# Altium PCB RheoBoard_V1.PcbDoc (part 4 of 6)
Units mm, origin at the board's own origin, x right, y up, seen from the top; angles counter-clockwise.
Board outline 146 x 88.34 mm, 2 copper layers (Top Layer, Bottom Layer); 134 components, 71 nets, 344 pads, 145 vias.
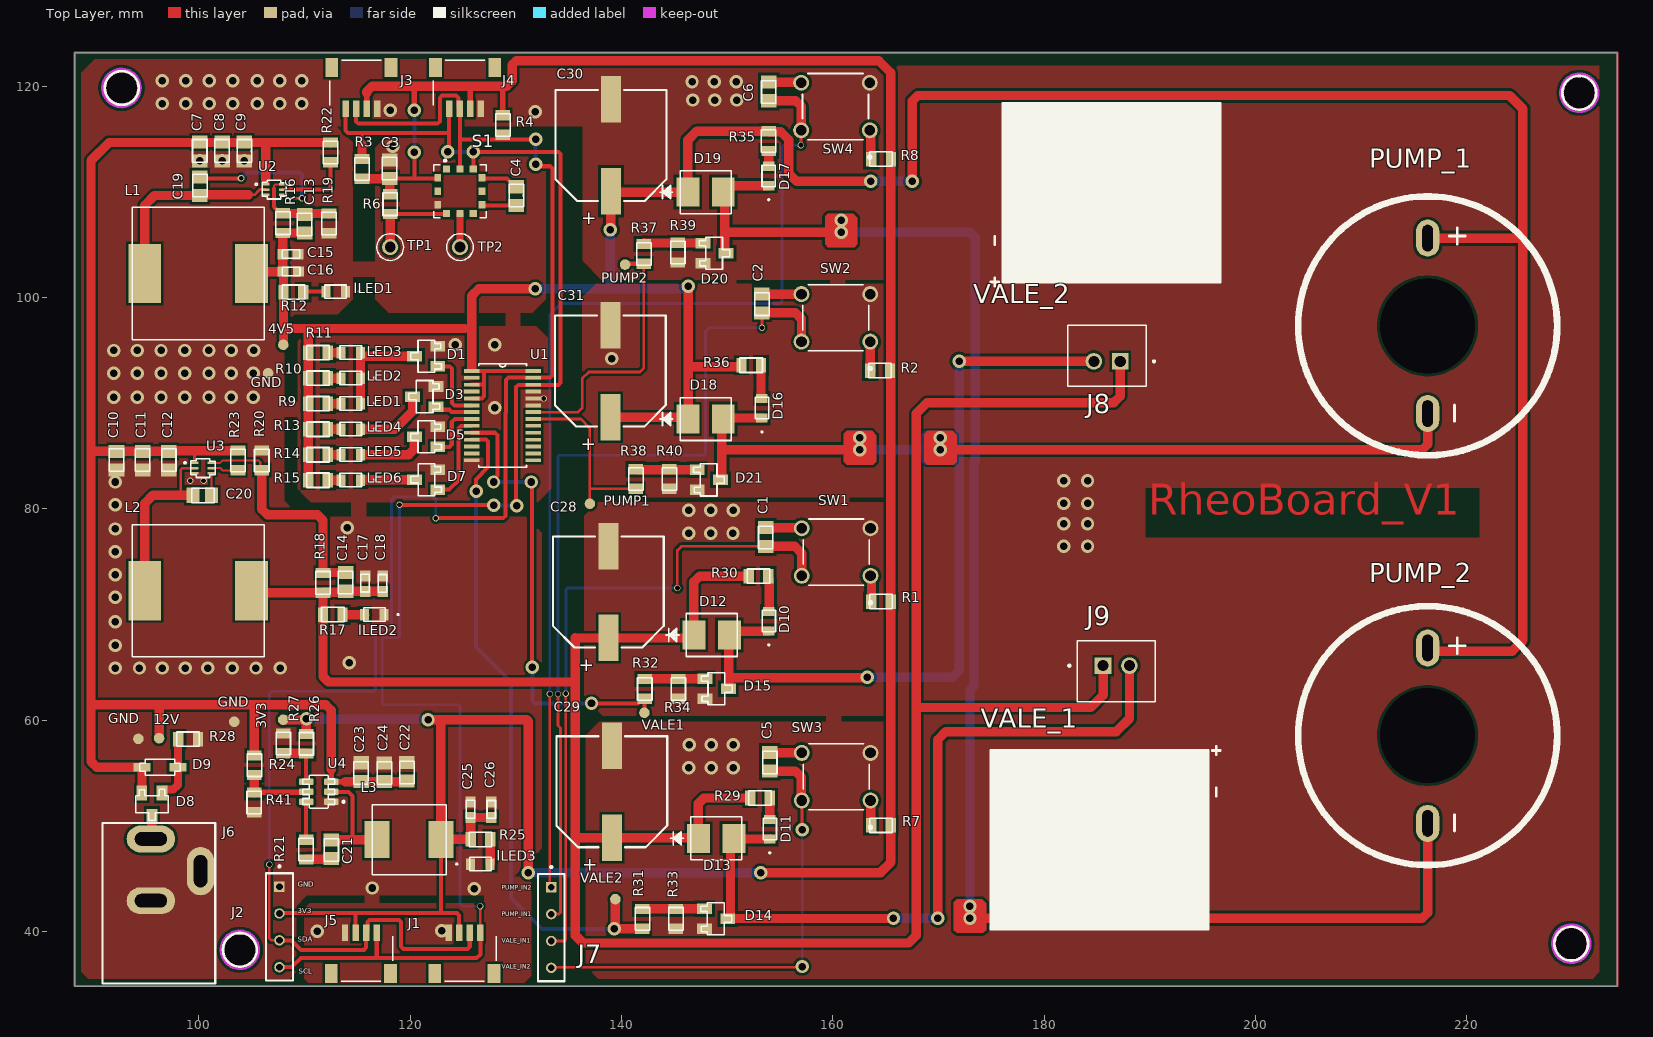
[diagram p0: Top Layer view]

## Part data (continued)
R26: library part "RES_SMD 75K OHM 1% 1/8W 0805", "Res Thick Film 0805 75K Ohm 1% 1/8W ±100ppm/°C Molded SMD SMD Paper Tape on Plastic Reel", Case Code (Imperial)=0805, Case Code (Metric)=2012, Manufacturer=Bourns, Manufacturer Part Number=CR0805-FX-7502ELF, Max Operating Temperature=155°C, Min Operating Temperature=-55°C, Power Rating=125mW, Resistance=75kΩ, Supplier Part Number 1=118-CR0805-FX-7502ELFTR-ND, Temperature Coefficient=100ppm/°C, Tolerance=1%, Voltage Rating=150V, Case/Package=0805, Category="Chip SMD Resistors", China RoHS=Non-Compliant, ComponentLink1Description=https://datasheet.octopart.com:443/CR0805-FX-7502ELF-Bourns-datasheet-159578630.pdf?src-supplier=JRH+Electronics, ComponentLink1URL=https://datasheet.octopart.com:443/CR0805-FX-7502ELF-Bourns-datasheet-159578630.pdf?src-supplier=JRH+Electronics, ComponentLink2Description=https://datasheet.octopart.com:443/CR0805-FX-7502ELF-Bourns-datasheet-181955239.pdf?src-supplier=IHS, ComponentLink2URL=https://datasheet.octopart.com:443/CR0805-FX-7502ELF-Bourns-datasheet-181955239.pdf?src-supplier=IHS, ComponentLink3Description=https://datasheet.octopart.com:443/CR0805-FX-7502ELF-Bourns-datasheet-68301634.pdf?src-supplier=Burklin+Elektronik, ComponentLink3URL=https://datasheet.octopart.com:443/CR0805-FX-7502ELF-Bourns-datasheet-68301634.pdf?src-supplier=Burklin+Elektronik, ComponentLink4Description=https://datasheet.octopart.com/CR0805-FX-7502ELF-Bourns-datasheet-5318152.pdf, ComponentLink4URL=https://datasheet.octopart.com/CR0805-FX-7502ELF-Bourns-datasheet-5318152.pdf, ComponentLink5Description=https://datasheet.octopart.com:443/CR0805-FX-7502ELF-Bourns-datasheet-154729663.pdf?src-supplier=Electro+Sonic, ComponentLink5URL=https://datasheet.octopart.com:443/CR0805-FX-7502ELF-Bourns-datasheet-154729663.pdf?src-supplier=Electro+Sonic, ComponentLink6Description=https://datasheet.octopart.com:443/CR0805-FX-7502ELF-Bourns-datasheet-140567134.pdf?src-supplier=Arrow.cn, ComponentLink6URL=https://datasheet.octopart.com:443/CR0805-FX-7502ELF-Bourns-datasheet-140567134.pdf?src-supplier=Arrow.cn, ComponentLink7Description=http://sigma.octopart.com:80/conflict_mineral_statement/Bourns-company-36.pdf?src-supplier=Compliance+Statements, ComponentLink7URL=http://sigma.octopart.com:80/conflict_mineral_statement/Bourns-company-36.pdf?src-supplier=Compliance+Statements, Composition="Thick Film", Contact Plating=Tin, Depth=1.25mm, Height=500µm, Length=2mm, LIB MADE BY="MR HOANG", Lifecycle Status=Production, Link=https://linhkien.cxtvn.com/6157-dien-tro-75k-0805-1-100c.html, Military Standard=Not, Mount="Surface Mount", Number of Terminals=2, Packaging="Tape & Reel", Pricing 1="5000=0.0052, 10000=0.0046, 15000=0.00432, 25000=0.004, 35000=0.00382, 50000=0.00366 (USD)", Radiation Hardening=No, REACH SVHC=Yes, RoHS=Compliant, Schedule B="8533210025, 8533210045, 8533210045|8533210045, 8533210045|8533210045|8533210045", Stock 1=616608, Supplier 1=DigiKey, Termination=SMD/SMT, Thickness=508µm, Voltage Rating (DC)=150V, Width=1.25mm, Working Voltage=150V
R27: library part "RES_SMD 24K OHM 1% 1/8W 0805", "Res Thick Film 0805 24K Ohm 1% 0.125W(1/8W) ±100ppm/C Pad SMD T/R", Case Code (Imperial)=0805, Manufacturer="Yageo Group", Manufacturer Package Identifier="0805 (2012 metric)", Manufacturer Part Number=RC0805FR-0724KL, Max Operating Temperature=155°C, Min Operating Temperature=-55°C, Power Rating=125mW, Resistance=24kΩ, Supplier Part Number 1=311-24.0KCRCT-ND, Temperature Coefficient=100ppm/°C, Tolerance=1%, Voltage Rating=150V, Case/Package=0805, Category="Chip SMD Resistors", China RoHS=Non-Compliant, ComponentLink1Description=https://datasheet.octopart.com:443/RC0805FR-0724KL-Yageo-datasheet-175887523.pdf?src-supplier=Newark, ComponentLink1URL=https://datasheet.octopart.com:443/RC0805FR-0724KL-Yageo-datasheet-175887523.pdf?src-supplier=Newark, ComponentLink2Description=https://datasheet.octopart.com:443/RC0805FR-0724KL-Yageo-datasheet-103092701.pdf?src-supplier=Upverter, ComponentLink2URL=https://datasheet.octopart.com:443/RC0805FR-0724KL-Yageo-datasheet-103092701.pdf?src-supplier=Upverter, ComponentLink3Description=https://datasheet.octopart.com:443/RC0805FR-0724KL-Yageo-datasheet-8330313.pdf?src-supplier=Burklin+Elektronik, ComponentLink3URL=https://datasheet.octopart.com:443/RC0805FR-0724KL-Yageo-datasheet-8330313.pdf?src-supplier=Burklin+Elektronik, ComponentLink4Description=https://datasheet.octopart.com:443/RC0805FR-0724KL-Yageo-Group-datasheet-176638170.pdf?src-supplier=Future+Electronics, ComponentLink4URL=https://datasheet.octopart.com:443/RC0805FR-0724KL-Yageo-Group-datasheet-176638170.pdf?src-supplier=Future+Electronics, ComponentLink5Description=https://datasheet.octopart.com:443/RC0805FR-0724KL-Yageo-datasheet-164759695.pdf?src-supplier=Future+Electronics, ComponentLink5URL=https://datasheet.octopart.com:443/RC0805FR-0724KL-Yageo-datasheet-164759695.pdf?src-supplier=Future+Electronics, ComponentLink6Description=https://datasheet.octopart.com:443/RC0805FR-0724KL-Yageo-datasheet-12592811.pdf?src-supplier=Future+Electronics, ComponentLink6URL=https://datasheet.octopart.com:443/RC0805FR-0724KL-Yageo-datasheet-12592811.pdf?src-supplier=Future+Electronics, ComponentLink7Description=https://datasheet.octopart.com:443/RC0805FR-0724KL-Yageo-datasheet-8324252.pdf?src-supplier=Future+Electronics, ComponentLink7URL=https://datasheet.octopart.com:443/RC0805FR-0724KL-Yageo-datasheet-8324252.pdf?src-supplier=Future+Electronics, ComponentLink8Description=https://datasheet.octopart.com:443/RC0805FR-0724KL-Yageo-datasheet-148775077.pdf?src-supplier=TME, ComponentLink8URL=https://datasheet.octopart.com:443/RC0805FR-0724KL-Yageo-datasheet-148775077.pdf?src-supplier=TME, ComponentLink9Description=https://datasheet.octopart.com/RC0805FR-0724KL-Yageo-datasheet-73766026.pdf, ComponentLink9URL=https://datasheet.octopart.com/RC0805FR-0724KL-Yageo-datasheet-73766026.pdf, ComponentLink10Description=https://datasheet.octopart.com:443/RC0805FR-0724KL-Yageo-datasheet-118657.pdf?src-supplier=DigiKey, ComponentLink10URL=https://datasheet.octopart.com:443/RC0805FR-0724KL-Yageo-datasheet-118657.pdf?src-supplier=DigiKey, ComponentLink11Description=http://sigma.octopart.com:80/conflict_mineral_statement/Yageo-company-3.pdf?src-supplier=Compliance+Statements, ComponentLink11URL=http://sigma.octopart.com:80/conflict_mineral_statement/Yageo-company-3.pdf?src-supplier=Compliance+Statements, ComponentLink12Description=http://sigma.octopart.com:80/rohs_statement/Yageo-company-2.pdf?src-supplier=Compliance+Statements, ComponentLink12URL=http://sigma.octopart.com:80/rohs_statement/Yageo-company-2.pdf?src-supplier=Compliance+Statements, Composition="Thick Film", Depth=1.25mm, Height=500µm, Lead Free="Lead Free", Length=2mm, LIB MADE BY="MR HOANG", Lifecycle Status=Production, Link=https://linhkien.cxtvn.com/9235-dien-tro-0805-1-thong-so-tu-1k-den-91k.html, Military Standard=Not, Mount="Surface Mount", Number of Terminals=2, Packaging="Tape & Reel", Pricing 1="1=0.1, 10=0.034, 25=0.0256, 50=0.0208, 100=0.0171, 250=0.01344, 500=0.01136, 1000=0.00973 (USD)", REACH SVHC=Yes, RoHS=Compliant, Schedule B="8533210045, 8533210045|8533210045|8533210045|8533210045|8533210045|8533210045|8533210045|8533210045|8533210045|8533210045|8533210045|8533210045|8533210045|8533210045|8533210045|8533210045|8533210045|8533210045|8533210045|8533210045|8533210045|8533210045|8533210045|85", Stock 1=56824, Supplier 1=DigiKey, Termination=SMD/SMT, Voltage Rating (DC)=150V, Weight=5.499807mg, Width=1.25mm, Working Voltage=150V
R31 R32 R37 R38: library part "RES_SMD 100 OHM 1% 1/8W 0805", "Resistor Thick Film 0805 100 Ohm 1% 1/8W 100ppm/C Molded SMD Punched Carrier T/R", Case Code (Imperial)=0805, Manufacturer=Panasonic, Manufacturer Lifecycle Status=ACTIVE, Manufacturer Package Identifier="0805 (2012 metric)", Manufacturer Part Number=ERJ6ENF1000V, Max Operating Temperature=155°C, Max Power Dissipation=125mW, Min Operating Temperature=-55°C, Ratings=AEC-Q200, Resistance=100Ω, Supplier Part Number 1=P100CCT-ND, Temperature Coefficient=100ppm/°C, Tolerance=1%, Voltage Rating=150V, Case/Package=0805, Category="Chip SMD Resistors", China RoHS=Non-Compliant, ComponentLink1Description=https://datasheet.octopart.com:443/ERJ6ENF1000V-Panasonic-datasheet-82288794.pdf?src-supplier=Future+Electronics, ComponentLink1URL=https://datasheet.octopart.com:443/ERJ6ENF1000V-Panasonic-datasheet-82288794.pdf?src-supplier=Future+Electronics, ComponentLink2Description=https://datasheet.octopart.com:443/ERJ-6ENF1000V-Panasonic-datasheet-10025800.pdf?src-supplier=Future+Electronics, ComponentLink2URL=https://datasheet.octopart.com:443/ERJ-6ENF1000V-Panasonic-datasheet-10025800.pdf?src-supplier=Future+Electronics, ComponentLink3Description=https://datasheet.octopart.com:443/ERJ-6ENF1000V-Panasonic-datasheet-8853621.pdf?src-supplier=Future+Electronics, ComponentLink3URL=https://datasheet.octopart.com:443/ERJ-6ENF1000V-Panasonic-datasheet-8853621.pdf?src-supplier=Future+Electronics, ComponentLink4Description=https://datasheet.octopart.com:443/ERJ6ENF1000V-Panasonic-datasheet-48891056.pdf?src-supplier=Upverter, ComponentLink4URL=https://datasheet.octopart.com:443/ERJ6ENF1000V-Panasonic-datasheet-48891056.pdf?src-supplier=Upverter, ComponentLink5Description=https://datasheet.octopart.com:443/ERJ6ENF1000V-Panasonic-datasheet-13266541.pdf?src-supplier=element14+APAC, ComponentLink5URL=https://datasheet.octopart.com:443/ERJ6ENF1000V-Panasonic-datasheet-13266541.pdf?src-supplier=element14+APAC, ComponentLink6Description=https://datasheet.octopart.com:443/ERJ6ENF1000V-Panasonic-datasheet-5313456.pdf?src-supplier=Farnell, ComponentLink6URL=https://datasheet.octopart.com:443/ERJ6ENF1000V-Panasonic-datasheet-5313456.pdf?src-supplier=Farnell, ComponentLink7Description=https://datasheet.octopart.com:443/ERJ6ENF1000V-Panasonic-datasheet-136608610.pdf?src-supplier=Newark, ComponentLink7URL=https://datasheet.octopart.com:443/ERJ6ENF1000V-Panasonic-datasheet-136608610.pdf?src-supplier=Newark, ComponentLink8Description=https://datasheet.octopart.com:443/ERJ-6ENF1000V.-Panasonic-datasheet-182872238.pdf?src-supplier=Newark, ComponentLink8URL=https://datasheet.octopart.com:443/ERJ-6ENF1000V.-Panasonic-datasheet-182872238.pdf?src-supplier=Newark, ComponentLink9Description=https://datasheet.octopart.com:443/ERJ-6ENF1000V-Panasonic-datasheet-154766169.pdf?src-supplier=Master+Electronics, ComponentLink9URL=https://datasheet.octopart.com:443/ERJ-6ENF1000V-Panasonic-datasheet-154766169.pdf?src-supplier=Master+Electronics, ComponentLink10Description=https://datasheet.octopart.com:443/ERJ6ENF1000V-Panasonic-datasheet-138819429.pdf?src-supplier=Burklin+Elektronik, ComponentLink10URL=https://datasheet.octopart.com:443/ERJ6ENF1000V-Panasonic-datasheet-138819429.pdf?src-supplier=Burklin+Elektronik, ComponentLink11Description=https://datasheet.octopart.com/ERJ6ENF1000V-Panasonic-datasheet-78375410.pdf, ComponentLink11URL=https://datasheet.octopart.com/ERJ6ENF1000V-Panasonic-datasheet-78375410.pdf, ComponentLink12Description=https://datasheet.octopart.com:443/ERJ-6ENF1000V-Panasonic-datasheet-7269995.pdf?src-supplier=Jameco+(USA), ComponentLink12URL=https://datasheet.octopart.com:443/ERJ-6ENF1000V-Panasonic-datasheet-7269995.pdf?src-supplier=Jameco+(USA), ComponentLink13Description=https://datasheet.octopart.com:443/ERJ-6ENF1000V-Panasonic-datasheet-118621.pdf?src-supplier=DigiKey, ComponentLink13URL=https://datasheet.octopart.com:443/ERJ-6ENF1000V-Panasonic-datasheet-118621.pdf?src-supplier=DigiKey, ComponentLink14Description=https://datasheet.octopart.com:443/ERJ-6ENF1000V-Panasonic-datasheet-41391857.pdf?src-supplier=Electro+Sonic, ComponentLink14URL=https://datasheet.octopart.com:443/ERJ-6ENF1000V-Panasonic-datasheet-41391857.pdf?src-supplier=Electro+Sonic, Composition="Thick Film", Contact Plating=Tin, Depth=1.25mm, Features="Automotive AEC-Q200", Height=600µm, Lead Free="Lead Free", Length=2mm, LIB MADE BY="MR HOANG", Lifecycle Status=Production, Link=https://www.lcsc.com/product-detail/C105577.html?s_z=n_q_RC0805FR-07100RL&spm=wm.fly.bg.0.xh&lcsc_vid=TlIIBF1XRVRWVwJWFFYIUAFRFVhYUgJWEQcPV1JURlgxVlNeQlVXV11RRVdcVzsOAxUeFF5JWBYZEEoKFBINSQcJGk4dAgUUFAk%3D, Military Standard=Not, Mount="Surface Mount", Number of Pins=2, Number of Terminals=2, Number of Terminations=2, Packaging="Tape and Reel", Part Series="Precision Thick Film Chip Resistors", Power Rating=125mW, Pricing 1="1=0.12, 10=0.058, 25=0.0448, 50=0.0372, 100=0.0313, 250=0.02532, 500=0.02194, 1000=0.01927 (USD)", Radiation Hardening=No, REACH SVHC=Yes, RoHS=Compliant, Schedule B="8533210045, 8533210045|8533210045|8533210045|8533210045|8533210045|8533210045|8533210045|8533210045|8533210045, 8533210045|8533210045|8533210045|8533210045|8533210045|8533210045|8533210045|8533210045|8533210045|8533210045, 8533210045|8533210045|8533210045|8533210045|8533210045|8533210045|8533210045|8533210045|8533210045|8533210045|8533210045", Stock 1=295478, Supplier 1=DigiKey, Termination=SMD/SMT, Voltage Rating (DC)=150V, Width=1.25mm, Working Voltage=150V
R41: library part "RES_SMD 36.5K OHM 1% 1/8W 0805", "Res Thick Film 0805 36.5K Ohm 1% 0.125W ±100ppm/°C Molded SMD Paper T/R", Case Code (Imperial)=0805, Case Code (Metric)=2012, Manufacturer="Stackpole Electronics", Manufacturer Package Identifier="0805 (2012 metric)", Manufacturer Part Number=RMCF0805FT36K5, Max Operating Temperature=155°C, Max Power Dissipation=125mW, Min Operating Temperature=-55°C, Ratings=AEC-Q200, Resistance=36.5kΩ, Supplier Part Number 1=738-RMCF0805FT36K5DKR-ND, Temperature Coefficient=100ppm/°C, Tolerance=1%, Voltage Rating=150V, Case/Package=0805, Category="Chip SMD Resistors", China RoHS=Non-Compliant, ComponentLink1Description=https://datasheet.octopart.com:443/RMCF0805FT36K5-Stackpole-Electronics-datasheet-182148065.pdf?src-supplier=IHS, ComponentLink1URL=https://datasheet.octopart.com:443/RMCF0805FT36K5-Stackpole-Electronics-datasheet-182148065.pdf?src-supplier=IHS, ComponentLink2Description=https://datasheet.octopart.com:443/RMCF0805FT36K5-Stackpole-Electronics-datasheet-28504820.pdf?src-supplier=Upverter, ComponentLink2URL=https://datasheet.octopart.com:443/RMCF0805FT36K5-Stackpole-Electronics-datasheet-28504820.pdf?src-supplier=Upverter, ComponentLink3Description=https://datasheet.octopart.com:443/RMCF0805FT36K5-Stackpole-Electronics-datasheet-141193804.pdf?src-supplier=Stackpole+Electronics, ComponentLink3URL=https://datasheet.octopart.com:443/RMCF0805FT36K5-Stackpole-Electronics-datasheet-141193804.pdf?src-supplier=Stackpole+Electronics, ComponentLink4Description=https://datasheet.octopart.com:443/RMCF0805FT36K5-Stackpole-Electronics-datasheet-62091608.pdf?src-supplier=Stackpole+Electronics, ComponentLink4URL=https://datasheet.octopart.com:443/RMCF0805FT36K5-Stackpole-Electronics-datasheet-62091608.pdf?src-supplier=Stackpole+Electronics, ComponentLink5Description=https://datasheet.octopart.com:443/RMCF0805FT36K5-Stackpole-Electronics-datasheet-12534581.pdf?src-supplier=Stackpole+Electronics, ComponentLink5URL=https://datasheet.octopart.com:443/RMCF0805FT36K5-Stackpole-Electronics-datasheet-12534581.pdf?src-supplier=Stackpole+Electronics, ComponentLink6Description=https://datasheet.octopart.com:443/RMCF0805FT36K5-Stackpole-Electronics-datasheet-10788263.pdf?src-supplier=Stackpole+Electronics, ComponentLink6URL=https://datasheet.octopart.com:443/RMCF0805FT36K5-Stackpole-Electronics-datasheet-10788263.pdf?src-supplier=Stackpole+Electronics, ComponentLink7Description=http://sigma.octopart.com:80/15940719/materials_sheet/Stackpole-Electronics-RMCF0805FT36K5.pdf?src-supplier=Compliance+Statements, ComponentLink7URL=http://sigma.octopart.com:80/15940719/materials_sheet/Stackpole-Electronics-RMCF0805FT36K5.pdf?src-supplier=Compliance+Statements, ComponentLink8Description=http://sigma.octopart.com:80/141158211/reach_statement/Stackpole-Electronics-RMCF0805FT36K5.pdf?src-supplier=Compliance+Statements, ComponentLink8URL=http://sigma.octopart.com:80/141158211/reach_statement/Stackpole-Electronics-RMCF0805FT36K5.pdf?src-supplier=Compliance+Statements, ComponentLink9Description=http://sigma.octopart.com:80/141158212/rohs_statement/Stackpole-Electronics-RMCF0805FT36K5.pdf?src-supplier=Compliance+Statements, ComponentLink9URL=http://sigma.octopart.com:80/141158212/rohs_statement/Stackpole-Electronics-RMCF0805FT36K5.pdf?src-supplier=Compliance+Statements, Composition="Thick Film", Contact Plating=Tin, Depth=1.25mm, Height=500µm, Length=2mm, LIB MADE BY="MR HOANG", Lifecycle Status=Production, Link=https://www.lcsc.com/product-detail/C3992899.html?s_z=n_q_RMCF0805FT36K5&spm=wm.fly.bg.0.xh&lcsc_vid=FlMMUgJST1FcAwECRwALVlxQQAdaX1xfRFUPAlJUQFExVlNeTlBZX11UQlFbVDsOAxUeFF5JWBYZEEoKFBINSQcJGk4MFQUIE0wKAhAHHg1BVlVWWQkaCgg%3D, Military Standard=Not, Mount="Surface Mount", Number of Terminals=2, Number of Terminations=2, Packaging="Tape & Reel (TR)", Power Rating=125mW, Pricing 1="1=0.1, 10=0.027, 25=0.0196, 50=0.0156, 100=0.0127, 250=0.00988, 500=0.00824, 1000=0.00697 (USD)", Radiation Hardening=No, REACH SVHC=Unaffected, RoHS=Compliant, Schedule B="8533210045, 8533210045|8533210045|8533210045|8533210045|8533210045", Stock 1=2232, Supplier 1=DigiKey, Width=1.25mm, Working Voltage=150V
S1: library part "SENSOR 25PSIA 0.1\" 24BIT", "Board Mount Pressure Sensor -0.3V to 3.9V 0psi to 25psi Absolute 12-Pin T/R", Case/Package=SMD/SMT, Current Rating=1.7mA, Manufacturer=Honeywell, Max Operating Temperature=85°C, Max Supply Voltage=3.6V, Min Operating Temperature=-40°C, Min Supply Voltage=1.8V, Operating Supply Current=33.8µA, Supplier Part Number 1=480-7098-2-ND, Accuracy=0.25%, Category="Pressure Sensors", ComponentLink1Description=https://datasheet.octopart.com:443/MPRLS0025PA00001A-Honeywell-datasheet-166035665.pdf?src-supplier=ODG+(Origin+Data+Global), ComponentLink1URL=https://datasheet.octopart.com:443/MPRLS0025PA00001A-Honeywell-datasheet-166035665.pdf?src-supplier=ODG+(Origin+Data+Global), ComponentLink2Description=https://datasheet.octopart.com:443/MPRLS0025PA00001A-Honeywell-datasheet-147661376.pdf?src-supplier=Upverter, ComponentLink2URL=https://datasheet.octopart.com:443/MPRLS0025PA00001A-Honeywell-datasheet-147661376.pdf?src-supplier=Upverter, ComponentLink3Description=https://datasheet.octopart.com:443/MPRLS0025PA00001A-Honeywell-datasheet-97324467.pdf?src-supplier=Sager+Electronics, ComponentLink3URL=https://datasheet.octopart.com:443/MPRLS0025PA00001A-Honeywell-datasheet-97324467.pdf?src-supplier=Sager+Electronics, ComponentLink4Description=https://datasheet.octopart.com:443/MPRLS0025PA00001A-Honeywell-datasheet-140701490.pdf?src-supplier=Sager+Electronics, ComponentLink4URL=https://datasheet.octopart.com:443/MPRLS0025PA00001A-Honeywell-datasheet-140701490.pdf?src-supplier=Sager+Electronics, ComponentLink5Description=https://datasheet.octopart.com:443/MPRLS0025PA00001A-Honeywell-datasheet-136492114.pdf?src-supplier=Master+Electronics, ComponentLink5URL=https://datasheet.octopart.com:443/MPRLS0025PA00001A-Honeywell-datasheet-136492114.pdf?src-supplier=Master+Electronics, ComponentLink6Description=https://datasheet.octopart.com:443/MPRLS0025PA00001A-Honeywell-datasheet-142341669.pdf?src-supplier=Honeywell, ComponentLink6URL=https://datasheet.octopart.com:443/MPRLS0025PA00001A-Honeywell-datasheet-142341669.pdf?src-supplier=Honeywell, ComponentLink7Description=https://datasheet.octopart.com:443/MPRLS0025PA00001A-Honeywell-datasheet-116854048.pdf?src-supplier=Honeywell, ComponentLink7URL=https://datasheet.octopart.com:443/MPRLS0025PA00001A-Honeywell-datasheet-116854048.pdf?src-supplier=Honeywell, ComponentLink8Description=https://datasheet.octopart.com:443/MPRLS0025PA00001A-Honeywell-datasheet-103078335.pdf?src-supplier=Honeywell, ComponentLink8URL=https://datasheet.octopart.com:443/MPRLS0025PA00001A-Honeywell-datasheet-103078335.pdf?src-supplier=Honeywell, ComponentLink9Description=https://sigma.octopart.com:443/103078336/instruction_sheet/Honeywell-MPRLS0025PA00001A.pdf?src-supplier=Honeywell, ComponentLink9URL=https://sigma.octopart.com:443/103078336/instruction_sheet/Honeywell-MPRLS0025PA00001A.pdf?src-supplier=Honeywell, ComponentLink10Description=https://sigma.octopart.com:443/102925452/instruction_sheet/Honeywell-MPRLS0025PA00001A.pdf?src-supplier=Honeywell, ComponentLink10URL=https://sigma.octopart.com:443/102925452/instruction_sheet/Honeywell-MPRLS0025PA00001A.pdf?src-supplier=Honeywell, ComponentLink11Description=https://datasheet.octopart.com:443/MPRLS0025PA00001A-Honeywell-datasheet-101670856.pdf?src-supplier=Honeywell, ComponentLink11URL=https://datasheet.octopart.com:443/MPRLS0025PA00001A-Honeywell-datasheet-101670856.pdf?src-supplier=Honeywell, ComponentLink12Description=https://sigma.octopart.com:443/97324468/instruction_sheet/Honeywell-MPRLS0025PA00001A.pdf?src-supplier=Honeywell, ComponentLink12URL=https://sigma.octopart.com:443/97324468/instruction_sheet/Honeywell-MPRLS0025PA00001A.pdf?src-supplier=Honeywell, ComponentLink13Description=https://datasheet.octopart.com:443/MPRLS0025PA00001A-Honeywell-datasheet-151108213.pdf?src-supplier=Electro+Sonic, ComponentLink13URL=https://datasheet.octopart.com:443/MPRLS0025PA00001A-Honeywell-datasheet-151108213.pdf?src-supplier=Electro+Sonic, ComponentLink14Description=https://datasheet.octopart.com:443/MPRLS0025PA00001A-Honeywell-datasheet-159777480.pdf?src-supplier=RS+(Formerly+Allied+Electronics), ComponentLink14URL=https://datasheet.octopart.com:443/MPRLS0025PA00001A-Honeywell-datasheet-159777480.pdf?src-supplier=RS+(Formerly+Allied+Electronics), ComponentLink15Description=https://datasheet.octopart.com:443/MPRLS0025PA00001A-Honeywell-datasheet-138697059.pdf?src-supplier=TME, ComponentLink15URL=https://datasheet.octopart.com:443/MPRLS0025PA00001A-Honeywell-datasheet-138697059.pdf?src-supplier=TME, ComponentLink16Description=https://datasheet.octopart.com:443/MPRLS0025PA00001A-Honeywell-datasheet-135974584.pdf?src-supplier=TME, ComponentLink16URL=https://datasheet.octopart.com:443/MPRLS0025PA00001A-Honeywell-datasheet-135974584.pdf?src-supplier=TME, ComponentLink17Description=http://sigma.octopart.com:80/conflict_mineral_statement/Honeywell-company-50.pdf?src-supplier=Compliance+Statements, ComponentLink17URL=http://sigma.octopart.com:80/conflict_mineral_statement/Honeywell-company-50.pdf?src-supplier=Compliance+Statements, Height=5.8mm, Length=5mm, LIB MADE BY="MR HOANG", Lifecycle Status=Production, Link=https://www.lcsc.com/product-detail/C3257154.html?s_z=n_q_t_MPRLS0025PA00001A&spm=wm.fly.bg.0.xh___wm.ssy.tc.0.tz&lcsc_vid=FlMMUgJST1FcAwECRwALVlxQQAdaX1xfRFUPAlJUQFExVlNeT1lZUl1eTlBcVDsOAxUeFF5JWBYZEEoKFBINSQcJGk4MFQUIE0wKAhAHHg1BVlVWWQkaCgg%3D, Manufacturer Part Number=MPRLS0025PA00001A, Max Pressure=25PSI, Nominal Supply Current=1.7mA, Number of Bits=14, Port Style=Barbless, Pricing 1="700=14.11196 (USD)", RoHS=Compliant, Schedule B="8542390000, 9026200000, 9026200000|9026200000, 9026200000|9026200000|9026200000", Stock 1=700, Supplier 1=DigiKey, Termination=Solder
SW1 SW2 SW3 SW4: library part "SWITCH TACTILE SPST-NO 0.05A 24V", "Switch Tactile N.O. SPST Flat Round Button PC Pins 0.05A 24VDC 0.98N Thru-Hole Bag", Color=Black, Contact Current Rating=50mA, Contact Resistance=100mΩ, Insulation Resistance=100MΩ, Manufacturer=Omron, Max Operating Temperature=70°C, Max Voltage Rating (DC)=24V, Min Operating Temperature=-25°C, Operating Force=1.27N, Supplier Part Number 1=B3F1020, Actuator Length=900µm, Category="Tactile Switches", ComponentLink1Description=https://datasheet.octopart.com:443/B3F-1020-Omron-datasheet-10910152.pdf?src-supplier=Omron, ComponentLink1URL=https://datasheet.octopart.com:443/B3F-1020-Omron-datasheet-10910152.pdf?src-supplier=Omron, ComponentLink2Description=https://datasheet.octopart.com:443/B3F-1020-Omron-datasheet-179667965.pdf?src-supplier=IHS, ComponentLink2URL=https://datasheet.octopart.com:443/B3F-1020-Omron-datasheet-179667965.pdf?src-supplier=IHS, ComponentLink3Description=https://datasheet.octopart.com:443/B3F-1020-Omron-datasheet-62106907.pdf?src-supplier=Master+Electronics, ComponentLink3URL=https://datasheet.octopart.com:443/B3F-1020-Omron-datasheet-62106907.pdf?src-supplier=Master+Electronics, ComponentLink4Description=https://datasheet.octopart.com:443/B3F-1020-Omron-datasheet-14713915.pdf?src-supplier=Farnell, ComponentLink4URL=https://datasheet.octopart.com:443/B3F-1020-Omron-datasheet-14713915.pdf?src-supplier=Farnell, ComponentLink5Description=https://datasheet.octopart.com:443/B3F-1020-Omron-datasheet-5318198.pdf?src-supplier=Sager+Electronics, ComponentLink5URL=https://datasheet.octopart.com:443/B3F-1020-Omron-datasheet-5318198.pdf?src-supplier=Sager+Electronics, ComponentLink6Description=https://datasheet.octopart.com:443/B3F-1020-Omron-datasheet-8815213.pdf?src-supplier=Newark, ComponentLink6URL=https://datasheet.octopart.com:443/B3F-1020-Omron-datasheet-8815213.pdf?src-supplier=Newark, ComponentLink7Description=https://datasheet.octopart.com:443/B3F-1020-Omron-datasheet-11778577.pdf?src-supplier=Arrow+Electronics, ComponentLink7URL=https://datasheet.octopart.com:443/B3F-1020-Omron-datasheet-11778577.pdf?src-supplier=Arrow+Electronics, ComponentLink8Description=https://datasheet.octopart.com:443/B3F-1020-Omron-datasheet-5319362.pdf?src-supplier=Verical, ComponentLink8URL=https://datasheet.octopart.com:443/B3F-1020-Omron-datasheet-5319362.pdf?src-supplier=Verical, ComponentLink9Description=https://datasheet.octopart.com:443/B3F-1020-Omron-datasheet-134074.pdf?src-supplier=DigiKey, ComponentLink9URL=https://datasheet.octopart.com:443/B3F-1020-Omron-datasheet-134074.pdf?src-supplier=DigiKey, ComponentLink10Description=https://datasheet.octopart.com:443/B3F-1020-Omron-datasheet-54411.pdf?src-supplier=RS+(Formerly+Allied+Electronics), ComponentLink10URL=https://datasheet.octopart.com:443/B3F-1020-Omron-datasheet-54411.pdf?src-supplier=RS+(Formerly+Allied+Electronics), ComponentLink11Description=https://datasheet.octopart.com:443/B3F-1020-Omron-datasheet-9586142.pdf?src-supplier=RS+(Formerly+Allied+Electronics), ComponentLink11URL=https://datasheet.octopart.com:443/B3F-1020-Omron-datasheet-9586142.pdf?src-supplier=RS+(Formerly+Allied+Electronics), Contact Material="Gold, Silver", Contact Plating=Silver, Current Rating=50mA, Depth=6mm, Electrical Life=1Mcycles, Export Control Classification Number (ECCN) Code=EAR99, Harmonized Tariff Schedule (HTS) Code=8536.50.90.40, Height=3.4mm, Illumination Type="Illuminated, Non-Illuminated", Introduction Date=1999-01-01, Lead Free="Lead Free", Length=6mm, LIB MADE BY="MR HOANG", Lifecycle Status=Production, Link=http://shopee.vn/C%C3%B4ng-t%E1%BA%AFc-Janpanomronswitch-B3F-1020-ki%E1%BB%83u-Nh%E1%BA%ADt-B%E1%BA%A3n-i.558568108.13735169249, Manufacturer Part Number=B3F-1020, Max Current Rating=50mA, Mechanical Life=1Mcycles, Mount=DIP, Number of Poles=1, Number of Positions=1, Packaging=Bulk, Pricing 1="159=0.516, 250=0.4953, 500=0.4774 (USD)", REACH SVHC=Unaffected, RoHS=Compliant, Stock 1=648, Supplier 1=Verical, Switch Function=Off-Mom, Switch Travel=250µm, Termination=Solder, Throw Configuration=SPST, Voltage Rating (DC)=24V, Weight=250mg, Width=6mm
TP1 TP2: library part "PC TEST POINT MINIATURE WHITE", "Test Point, Mini, Thm, Pc, .300 L, .100 Od, Heat Resistant Nylon 46, White", Color=White, Flammability Rating="UL94 V-0", Manufacturer=Keystone, Supplier Part Number 1=36-5002-ND, Body Material="Bronze, PBT", Category="Test Points", China RoHS=Compliant, ComponentLink1Description=https://datasheet.octopart.com:443/5002-Keystone-datasheet-138896739.pdf?src-supplier=Upverter, ComponentLink1URL=https://datasheet.octopart.com:443/5002-Keystone-datasheet-138896739.pdf?src-supplier=Upverter, ComponentLink2Description=https://datasheet.octopart.com:443/5002-Keystone-datasheet-15716159.pdf?src-supplier=IHS, ComponentLink2URL=https://datasheet.octopart.com:443/5002-Keystone-datasheet-15716159.pdf?src-supplier=IHS, ComponentLink3Description=https://datasheet.octopart.com:443/5002-Keystone-datasheet-23674.pdf?src-supplier=element14, ComponentLink3URL=https://datasheet.octopart.com:443/5002-Keystone-datasheet-23674.pdf?src-supplier=element14, ComponentLink4Description=https://datasheet.octopart.com:443/5002-Keystone-datasheet-60278094.pdf?src-supplier=LKR, ComponentLink4URL=https://datasheet.octopart.com:443/5002-Keystone-datasheet-60278094.pdf?src-supplier=LKR, ComponentLink5Description=https://datasheet.octopart.com:443/5002-Keystone-datasheet-9590016.pdf?src-supplier=Sager+Electronics, ComponentLink5URL=https://datasheet.octopart.com:443/5002-Keystone-datasheet-9590016.pdf?src-supplier=Sager+Electronics, ComponentLink6Description=https://datasheet.octopart.com:443/5002-Keystone-datasheet-10925273.pdf?src-supplier=RS+(Formerly+Allied+Electronics), ComponentLink6URL=https://datasheet.octopart.com:443/5002-Keystone-datasheet-10925273.pdf?src-supplier=RS+(Formerly+Allied+Electronics), ComponentLink7Description=https://datasheet.octopart.com:443/5002-Keystone-datasheet-6528.pdf?src-supplier=RS+(Formerly+Allied+Electronics), ComponentLink7URL=https://datasheet.octopart.com:443/5002-Keystone-datasheet-6528.pdf?src-supplier=RS+(Formerly+Allied+Electronics), ComponentLink8Description=https://datasheet.octopart.com:443/5002-Keystone-datasheet-15983577.pdf?src-supplier=element14+APAC, ComponentLink8URL=https://datasheet.octopart.com:443/5002-Keystone-datasheet-15983577.pdf?src-supplier=element14+APAC, ComponentLink9Description=https://datasheet.octopart.com:443/5002-Keystone-datasheet-549598.pdf?src-supplier=Future+Electronics, ComponentLink9URL=https://datasheet.octopart.com:443/5002-Keystone-datasheet-549598.pdf?src-supplier=Future+Electronics, ComponentLink10Description=https://datasheet.octopart.com:443/5002-Keystone-datasheet-542585.pdf?src-supplier=Future+Electronics, ComponentLink10URL=https://datasheet.octopart.com:443/5002-Keystone-datasheet-542585.pdf?src-supplier=Future+Electronics, ComponentLink11Description=https://datasheet.octopart.com:443/5002-Keystone-datasheet-7266429.pdf?src-supplier=Jameco+(USA), ComponentLink11URL=https://datasheet.octopart.com:443/5002-Keystone-datasheet-7266429.pdf?src-supplier=Jameco+(USA), Contact Material=Silver, Contact Plating=Tin, Country of Origin="Mainland China", Export Control Classification Number (ECCN) Code=EAR99, Height=4.57mm, Hole Diameter=1.6mm, Housing Color=White, Inside Diameter=1.27mm, Insulation=Insulated, Introduction Date=1995-10-01, Lead Free="Lead Free", Length=7.62mm, LIB MADE BY="MR HOANG", Lifecycle Status=Production, Link=https://linhkien.cxtvn.com/8661-5002-pc-test-point-miniature-white.html, Manufacturer Part Number=5002, Material="Bronze, Nylon, Silver", Mount="PCB, Through Hole", Number of Ports=1, Orientation=Straight, Outside Diameter=2.54mm, Packaging=Bulk, Plating=Silver, Pricing 1="1=0.25, 10=0.19, 2500=0.16, 5000=0.14 (USD)", REACH SVHC=Yes, RoHS=Compliant, Stock 1=831319, Supplier 1=DigiKey
U1: library part "IC LED DRVR LIN PWM 25MA 28TSSOP", "PCA9685 Series 5.5V 25 mA 1 MHz 12-bit PWM Fm+I2C-Bus LED Controller - TSSOP-28", Ambient Temperature Range High=85°C, Case/Package=TSSOP, Frequency=25MHz, High Level Output Current=10mA, Low Level Output Current=400A, Manufacturer="NXP Semiconductors", Max Power Dissipation=400mW, Max Supply Voltage=5.5V, Min Operating Temperature=-40°C, Min Supply Voltage=2.3V, Nominal Supply Current=6mA, Nominal Supply Voltage (DC)=3V, Output Current=25mA, Output Voltage=5V, Power Dissipation=400W, Supplier Part Number 1=568-11925-6-ND, Temperature Grade=Industrial, Category="LED Drivers", China RoHS=Compliant, ComponentLink1Description=https://datasheet.octopart.com:443/PCA9685PW%2C118-NXP-Semiconductors-datasheet-82522728.pdf?src-supplier=Newark, ComponentLink1URL=https://datasheet.octopart.com:443/PCA9685PW%2C118-NXP-Semiconductors-datasheet-82522728.pdf?src-supplier=Newark, ComponentLink2Description=https://sigma.octopart.com:443/138897933/technical_drawing/NXP-Semiconductors-PCA9685PW%2C118.pdf?src-supplier=Upverter, ComponentLink2URL=https://sigma.octopart.com:443/138897933/technical_drawing/NXP-Semiconductors-PCA9685PW%2C118.pdf?src-supplier=Upverter, ComponentLink3Description=https://datasheet.octopart.com:443/PCA9685PW%2C118-NXP-Semiconductors-datasheet-10031291.pdf?src-supplier=Upverter, ComponentLink3URL=https://datasheet.octopart.com:443/PCA9685PW%2C118-NXP-Semiconductors-datasheet-10031291.pdf?src-supplier=Upverter, ComponentLink4Description=https://datasheet.octopart.com:443/PCA9685PW%2C118-NXP-Semiconductors-datasheet-17019746.pdf?src-supplier=SHENGYU+ELECTRONICS, ComponentLink4URL=https://datasheet.octopart.com:443/PCA9685PW%2C118-NXP-Semiconductors-datasheet-17019746.pdf?src-supplier=SHENGYU+ELECTRONICS, ComponentLink5Description=https://datasheet.octopart.com:443/PCA9685PW%2C118-NXP-datasheet-8329821.pdf?src-supplier=Verical, ComponentLink5URL=https://datasheet.octopart.com:443/PCA9685PW%2C118-NXP-datasheet-8329821.pdf?src-supplier=Verical, ComponentLink6Description=http://sigma.octopart.com:80/reach_statement/NXP-Semiconductors-company-13.pdf?src-supplier=Compliance+Statements, ComponentLink6URL=http://sigma.octopart.com:80/reach_statement/NXP-Semiconductors-company-13.pdf?src-supplier=Compliance+Statements, ComponentLink7Description=http://sigma.octopart.com:80/rohs_statement/NXP-Semiconductors-company-12.pdf?src-supplier=Compliance+Statements, ComponentLink7URL=http://sigma.octopart.com:80/rohs_statement/NXP-Semiconductors-company-12.pdf?src-supplier=Compliance+Statements, Dimming=PWM, Export Control Classification Number (ECCN) Code=EAR99, Harmonized Tariff Schedule (HTS) Code=8542.39.00.01, Height=1.1mm, Height - Seated (Max)=1.1mm, Introduction Date=2008-07-25, Lead Free="Lead Free", Length=9.7mm, LIB MADE BY="MR HOANG", Lifecycle Status=Production, Link=https://www.lcsc.com/product-detail/C2678753.html?s_z=n_q_PCA9685PW%252C118&spm=wm.fly.bg.0.xh&lcsc_vid=FlMMUgJST1FcAwECRwALVlxQQAdaX1xfRFUPAlJUQFExVlNeTlFfVVNURVhaVjsOAxUeFF5JWBYZEEoKFBINSQcJGk4MFQUIE0wKAhAHHg1BVlVWWQkaCgg%3D, Manufacturer Part Number=PCA9685PW,118, Max Operating Temperature=85°C, Max Supply Current=10mA, Mount="Surface Mount", Number of Characters=16, Number of Circuits=1, Number of Outputs=16, Number of Pins=28, Number of Terminals=28, Output Current per Channel=25mA, Packaging="Tape and Reel", Pricing 1="1=3.94, 10=2.975, 25=2.7336, 100=2.4678, 250=2.34116, 500=2.32544 (USD)", Radiation Hardening=No, REACH SVHC=Unaffected, RoHS=Compliant, Schedule B="8542390000, 8542390000|8542390000|8542390000|8542390000|8542390000", Stock 1=14623, Supplier 1=DigiKey, Terminal Pitch=650µm, Width=4.4mm
U2 U3: library part "IC REG BUCK ADJ 3A SOT563_1", "4.2-V to 17-V input, 3-A synchronous buck converter in SOT563 6-SOT-5X3 -40 to 125", Manufacturer="Texas Instruments", Manufacturer Lifecycle Status=ACTIVE, Supplier Part Number 1=296-TPS563203DRLRDKR-ND, Category="Voltage Regulators - Switching", ComponentLink1Description=https://sigma.octopart.com:443/181443429/technical_drawing/Texas-Instruments-TPS563203DRLR.pdf?src-supplier=Texas+Instruments, ComponentLink1URL=https://sigma.octopart.com:443/181443429/technical_drawing/Texas-Instruments-TPS563203DRLR.pdf?src-supplier=Texas+Instruments, ComponentLink2Description=https://octopart.com:443/opatz8j6/c1?t=OaRPjUW5STEB5kgcrtuc3qDi83FIu7HuPS5gZaNtdGel-RibCakLKk-Z89dbxovFYCVQm9UkSqeICBgp-kpUqG28UtSg3dtcKln4YS_utjua2E60yMibCiEcL3xwNXNw-q1uSWLSiwE3iJEMrO5ToqNNz3kCcjL1hnMiOZrsz1duac8EwiANE3li11zUWEjknJ6MsmqJg_QyvEIjL95nMnxw7k3o0xh6D6dJxMvP426r3y2mGU8oZsXuLL24YDHAO1A9f4bM38ATqqUgtpjgbt0TEFb8jpLVHA8pfTaYV5pkk8kwTb-v_QdRRNEeNgw2RUBnetoFZFXC9zmcu5olxi1TB3hiB4dr3Wnt9qhggldlBEJak2pQhdBEcIpMqULeUWw6tRmiSuE&src-supplier=Texas+Instruments, ComponentLink2URL=https://octopart.com:443/opatz8j6/c1?t=OaRPjUW5STEB5kgcrtuc3qDi83FIu7HuPS5gZaNtdGel-RibCakLKk-Z89dbxovFYCVQm9UkSqeICBgp-kpUqG28UtSg3dtcKln4YS_utjua2E60yMibCiEcL3xwNXNw-q1uSWLSiwE3iJEMrO5ToqNNz3kCcjL1hnMiOZrsz1duac8EwiANE3li11zUWEjknJ6MsmqJg_QyvEIjL95nMnxw7k3o0xh6D6dJxMvP426r3y2mGU8oZsXuLL24YDHAO1A9f4bM38ATqqUgtpjgbt0TEFb8jpLVHA8pfTaYV5pkk8kwTb-v_QdRRNEeNgw2RUBnetoFZFXC9zmcu5olxi1TB3hiB4dr3Wnt9qhggldlBEJak2pQhdBEcIpMqULeUWw6tRmiSuE&src-supplier=Texas+Instruments, ComponentLink3Description=https://sigma.octopart.com:443/179311942/technical_drawing/Texas-Instruments-TPS563203DRLR.pdf?src-supplier=Texas+Instruments, ComponentLink3URL=https://sigma.octopart.com:443/179311942/technical_drawing/Texas-Instruments-TPS563203DRLR.pdf?src-supplier=Texas+Instruments, ComponentLink4Description=https://sigma.octopart.com:443/158890725/technical_drawing/Texas-Instruments-TPS563203DRLR.pdf?src-supplier=Texas+Instruments, ComponentLink4URL=https://sigma.octopart.com:443/158890725/technical_drawing/Texas-Instruments-TPS563203DRLR.pdf?src-supplier=Texas+Instruments, ComponentLink5Description=https://datasheet.octopart.com:443/TPS563203DRLR-Texas-Instruments-datasheet-184244552.pdf?src-supplier=LCSC, ComponentLink5URL=https://datasheet.octopart.com:443/TPS563203DRLR-Texas-Instruments-datasheet-184244552.pdf?src-supplier=LCSC, ComponentLink6Description=http://sigma.octopart.com:80/reach_statement/Texas-Instruments-company-64.pdf?src-supplier=Compliance+Statements, ComponentLink6URL=http://sigma.octopart.com:80/reach_statement/Texas-Instruments-company-64.pdf?src-supplier=Compliance+Statements, ComponentLink7Description=http://sigma.octopart.com:80/conflict_mineral_statement/Texas-Instruments-company-63.pdf?src-supplier=Compliance+Statements, ComponentLink7URL=http://sigma.octopart.com:80/conflict_mineral_statement/Texas-Instruments-company-63.pdf?src-supplier=Compliance+Statements, Height=600µm, Length=1.6mm, LIB MADE BY="MR HOANG", Lifecycle Status=Production, Link=https://www.lcsc.com/product-detail/C22445512.html?s_z=n_q_TPS563203DRLR&spm=wm.fly.bg.0.xh&lcsc_vid=FlMMUgJST1FcAwECRwALVlxQQAdaX1xfRFUPAlJUQFExVlNeT1ReU1FXQ1NaUjsOAxUeFF5JWBYZEEoKFBINSQcJGk4MFQUIE0wKAhAHHg1BVlVWWQkaCgg%3D, Manufacturer Part Number=TPS563203DRLR, Number of Pins=6, Pricing 1="1=0.33, 10=0.225, 25=0.1992, 100=0.1715, 250=0.15828, 500=0.15028, 1000=0.14369 (USD)", RoHS=Compliant, Stock 1=7733, Supplier 1=DigiKey, Thickness=550µm, Topology=Buck, Width=1.2mm
U4: library part "IC REG BUCK ADJ 3A SOT23", "4.5-V to 24-V input, 3-A output synchronous buck converter 6-SOT-23-THIN -40 to 125", Manufacturer="Texas Instruments", Manufacturer Lifecycle Status=ACTIVE, Supplier Part Number 1=296-53564-1-ND, Category="Voltage Regulators - Switching", ComponentLink1Description=https://sigma.octopart.com:443/180581133/technical_drawing/Texas-Instruments-TPS56339DDCT.pdf?src-supplier=Texas+Instruments, ComponentLink1URL=https://sigma.octopart.com:443/180581133/technical_drawing/Texas-Instruments-TPS56339DDCT.pdf?src-supplier=Texas+Instruments, ComponentLink2Description=https://octopart.com:443/opatz8j6/c1?t=5KdHNdZo1g2cLMJslo82GCaYy8Nq4-UnxlqrxLrEim4-QvEq7VAH-spCDAACc9DeX2tqN8DBJn76Mf1_FfuIkYzGWfxZojVoOX5b54Q3Z8nAM8wrBzoGNRLk65OitSRFKLmhrKU8b55Q2pX2d6H6rqfLNCdP3D71KYl2iBqWQ2oO6jIoUMWqPwWRTvQvTlc-7Cv8muTs3l-8t8ID7fJJ3ei63vT0oXW1g--wMhQmBs8qClQdIVe_ou3QgUsjgarG6WC0KIXK-Fos1U_-892IlwaAC19SJDERzQEm0XUxvbbCBsvMltlcniU2BeQtzeQ734EkJKHl0AMM9PsWJ8zhJGk-aJpYghjQwIjish2F4iALAbcOD7c7D2RuPYSPRbXf6QrjVQR96w&src-supplier=Texas+Instruments, ComponentLink2URL=https://octopart.com:443/opatz8j6/c1?t=5KdHNdZo1g2cLMJslo82GCaYy8Nq4-UnxlqrxLrEim4-QvEq7VAH-spCDAACc9DeX2tqN8DBJn76Mf1_FfuIkYzGWfxZojVoOX5b54Q3Z8nAM8wrBzoGNRLk65OitSRFKLmhrKU8b55Q2pX2d6H6rqfLNCdP3D71KYl2iBqWQ2oO6jIoUMWqPwWRTvQvTlc-7Cv8muTs3l-8t8ID7fJJ3ei63vT0oXW1g--wMhQmBs8qClQdIVe_ou3QgUsjgarG6WC0KIXK-Fos1U_-892IlwaAC19SJDERzQEm0XUxvbbCBsvMltlcniU2BeQtzeQ734EkJKHl0AMM9PsWJ8zhJGk-aJpYghjQwIjish2F4iALAbcOD7c7D2RuPYSPRbXf6QrjVQR96w&src-supplier=Texas+Instruments, ComponentLink3Description=https://sigma.octopart.com:443/179311906/technical_drawing/Texas-Instruments-TPS56339DDCT.pdf?src-supplier=Texas+Instruments, ComponentLink3URL=https://sigma.octopart.com:443/179311906/technical_drawing/Texas-Instruments-TPS56339DDCT.pdf?src-supplier=Texas+Instruments, ComponentLink4Description=https://sigma.octopart.com:443/159779760/technical_drawing/Texas-Instruments-TPS56339DDCT.pdf?src-supplier=Texas+Instruments, ComponentLink4URL=https://sigma.octopart.com:443/159779760/technical_drawing/Texas-Instruments-TPS56339DDCT.pdf?src-supplier=Texas+Instruments, ComponentLink5Description=https://sigma.octopart.com:443/149167535/technical_drawing/Texas-Instruments-TPS56339DDCT.pdf?src-supplier=Texas+Instruments, ComponentLink5URL=https://sigma.octopart.com:443/149167535/technical_drawing/Texas-Instruments-TPS56339DDCT.pdf?src-supplier=Texas+Instruments, ComponentLink6Description=https://sigma.octopart.com:443/49250152/technical_drawing/Texas-Instruments-TPS56339DDCT.pdf?src-supplier=Texas+Instruments, ComponentLink6URL=https://sigma.octopart.com:443/49250152/technical_drawing/Texas-Instruments-TPS56339DDCT.pdf?src-supplier=Texas+Instruments, ComponentLink7Description=http://sigma.octopart.com:80/conflict_mineral_statement/Texas-Instruments-company-63.pdf?src-supplier=Compliance+Statements, ComponentLink7URL=http://sigma.octopart.com:80/conflict_mineral_statement/Texas-Instruments-company-63.pdf?src-supplier=Compliance+Statements, ComponentLink8Description=http://sigma.octopart.com:80/reach_statement/Texas-Instruments-company-64.pdf?src-supplier=Compliance+Statements, ComponentLink8URL=http://sigma.octopart.com:80/reach_statement/Texas-Instruments-company-64.pdf?src-supplier=Compliance+Statements, ComponentLink9Description="New link", Height=1.1mm, Length=2.9mm, LIB MADE BY="MR HOANG", Lifecycle Status=Production, Link=https://www.lcsc.com/product-detail/C2071106.html, Manufacturer Part Number=TPS56339DDCT, Number of Pins=6, Pricing 1="1=1.54, 10=1.121, 25=1.0176, 100=0.9034 (USD)", RoHS=Compliant, Stock 1=2929, Supplier 1=DigiKey, Thickness=870µm, Topology=Buck, Width=1.6mm
VALE_1 VALE_2: library part "6V Air Valve with 2-pin JST XH Connector - FA0520E", "Connector Header 2 Position 6.35mm Solder Straight Thru-Hole 2 Terminal 1 Port MLX-Series", Color=Natural, Contact Resistance=3.5mΩ, Current Rating=13.5A, Dielectric Material=Polyester, Flammability Rating="UL94 V-2", Insulation Resistance=1GΩ, Manufacturer=Molex, Manufacturer Lifecycle Status=ACTIVE, Manufacturer Part Number=10-84-4022, Max Operating Temperature=105°C, Min Operating Temperature=-55°C, Operating Force=6.672N, Ratings=CSA, Supplier Part Number 1=WM1263-ND, Voltage Rating=600V, Category="Headers and Wire Housings", China RoHS=Compliant, ComponentLink1Description=https://datasheet.octopart.com:443/10-84-4022-Molex-datasheet-137053637.pdf?src-supplier=element14+APAC, ComponentLink1URL=https://datasheet.octopart.com:443/10-84-4022-Molex-datasheet-137053637.pdf?src-supplier=element14+APAC, ComponentLink2Description=https://datasheet.octopart.com:443/10-84-4022-Molex-datasheet-13791970.pdf?src-supplier=Molex, ComponentLink2URL=https://datasheet.octopart.com:443/10-84-4022-Molex-datasheet-13791970.pdf?src-supplier=Molex, ComponentLink3Description=https://sigma.octopart.com:443/16272272/technical_drawing/Molex-10-84-4022.pdf?src-supplier=Molex, ComponentLink3URL=https://sigma.octopart.com:443/16272272/technical_drawing/Molex-10-84-4022.pdf?src-supplier=Molex, ComponentLink4Description=https://datasheet.octopart.com:443/010844022-Molex-datasheet-5390850.pdf?src-supplier=Molex, ComponentLink4URL=https://datasheet.octopart.com:443/010844022-Molex-datasheet-5390850.pdf?src-supplier=Molex, ComponentLink5Description=https://datasheet.octopart.com:443/10-84-4022-Molex-datasheet-193058052.pdf?src-supplier=JRH+Electronics, ComponentLink5URL=https://datasheet.octopart.com:443/10-84-4022-Molex-datasheet-193058052.pdf?src-supplier=JRH+Electronics, ComponentLink6Description=https://datasheet.octopart.com:443/10-84-4022-Molex-datasheet-154742841.pdf?src-supplier=JRH+Electronics, ComponentLink6URL=https://datasheet.octopart.com:443/10-84-4022-Molex-datasheet-154742841.pdf?src-supplier=JRH+Electronics, ComponentLink7Description=https://datasheet.octopart.com:443/10-84-4022-Molex-datasheet-33343972.pdf?src-supplier=Electro+Sonic, ComponentLink7URL=https://datasheet.octopart.com:443/10-84-4022-Molex-datasheet-33343972.pdf?src-supplier=Electro+Sonic, ComponentLink8Description=https://datasheet.octopart.com:443/10-84-4022-Molex-datasheet-21205596.pdf?src-supplier=Electro+Sonic, ComponentLink8URL=https://datasheet.octopart.com:443/10-84-4022-Molex-datasheet-21205596.pdf?src-supplier=Electro+Sonic, ComponentLink9Description=https://datasheet.octopart.com:443/10-84-4022-Molex-datasheet-62102692.pdf?src-supplier=Electro+Sonic, ComponentLink9URL=https://datasheet.octopart.com:443/10-84-4022-Molex-datasheet-62102692.pdf?src-supplier=Electro+Sonic, ComponentLink10Description=https://datasheet.octopart.com:443/10-84-4022-Molex-datasheet-140174504.pdf?src-supplier=RS+(Formerly+Allied+Electronics), ComponentLink10URL=https://datasheet.octopart.com:443/10-84-4022-Molex-datasheet-140174504.pdf?src-supplier=RS+(Formerly+Allied+Electronics), ComponentLink11Description=https://datasheet.octopart.com:443/10-84-4022-Molex-datasheet-120134962.pdf?src-supplier=RS+(Formerly+Allied+Electronics), ComponentLink11URL=https://datasheet.octopart.com:443/10-84-4022-Molex-datasheet-120134962.pdf?src-supplier=RS+(Formerly+Allied+Electronics), ComponentLink12Description=https://datasheet.octopart.com:443/10-84-4022-Molex-datasheet-32867450.pdf?src-supplier=Newark, ComponentLink12URL=https://datasheet.octopart.com:443/10-84-4022-Molex-datasheet-32867450.pdf?src-supplier=Newark, ComponentLink13Description=https://datasheet.octopart.com:443/10844022-Molex-datasheet-8320017.pdf?src-supplier=Jameco+(USA), ComponentLink13URL=https://datasheet.octopart.com:443/10844022-Molex-datasheet-8320017.pdf?src-supplier=Jameco+(USA), ComponentLink14Description=https://datasheet.octopart.com:443/10-84-4022-Molex-datasheet-5314522.pdf?src-supplier=Verical, ComponentLink14URL=https://datasheet.octopart.com:443/10-84-4022-Molex-datasheet-5314522.pdf?src-supplier=Verical, ComponentLink15Description=https://datasheet.octopart.com:443/10-84-4022-Molex-datasheet-27226.pdf?src-supplier=DigiKey, ComponentLink15URL=https://datasheet.octopart.com:443/10-84-4022-Molex-datasheet-27226.pdf?src-supplier=DigiKey, ComponentLink16Description=http://sigma.octopart.com:80/16272275/rohs_statement/Molex-10-84-4022.pdf?src-supplier=Compliance+Statements, ComponentLink16URL=http://sigma.octopart.com:80/16272275/rohs_statement/Molex-10-84-4022.pdf?src-supplier=Compliance+Statements, ComponentLink17Description=http://sigma.octopart.com:80/reach_statement/Molex-company-74.pdf?src-supplier=Compliance+Statements, ComponentLink17URL=http://sigma.octopart.com:80/reach_statement/Molex-company-74.pdf?src-supplier=Compliance+Statements, ComponentLink18Description=http://sigma.octopart.com:80/rohs_statement/Molex-company-73.pdf?src-supplier=Compliance+Statements, ComponentLink18URL=http://sigma.octopart.com:80/rohs_statement/Molex-company-73.pdf?src-supplier=Compliance+Statements, ComponentLink19Description=http://sigma.octopart.com:80/conflict_mineral_statement/Molex-company-72.pdf?src-supplier=Compliance+Statements, ComponentLink19URL=http://sigma.octopart.com:80/conflict_mineral_statement/Molex-company-72.pdf?src-supplier=Compliance+Statements, Connector Type=Power, Contact Gender=Female, Contact Material=Bronze, Contact Plating=Tin, Country of Origin=US, Export Control Classification Number (ECCN) Code=EAR99, Gender=Female, Glow Wire Compliant=Non-compliant, Halogen Free="Low Halogen", Harmonized Tariff Schedule (HTS) Code=8536.69.40.30, Housing Material=Nylon, Introduction Date=1994-12-01, Lead Free="Lead Free", LIB MADE BY="MR HOANG", Lifecycle Status=Production, Link=https://www.lcsc.com/product-detail/C6955946.html?s_z=n_q_p_0010844022&spm=wm.ssy.bg.0.xh&lcsc_vid=FlMMUgJST1FcAwECRwALVlxQQAdaX1xfRFUPAlJUQFExVlNeTlFaV1NTRVlYVTsOAxUeFF5JWBYZEEoKFBINSQcJGk4MFQUIE0wKAhAHHg1BVlVWWQkaCgg%3D, Mount="Through Hole", Number of Circuits=2, Number of Contacts=2, Number of Pins=2, Number of Positions=2, Number of Rows=1, Orientation=Vertical, Packaging=Carton, Pitch=6.35mm, Plating=Tin, Plating Thickness=3.5052µm, Pricing 1="1=0.51, 10=0.436, 100=0.3706, 500=0.33078, 1836=0.30175, 5508=0.27924, 11016=0.26592 (USD)", Radiation Hardening=No, REACH SVHC=Unaffected, RoHS=Compliant, Schedule B="8536694040, 8536694040|8536694040|8536694040|8536694040|8536694040", Shell Material=POLYAMIDE66, Stock 1=11507, Supplier 1=DigiKey, Terminal Pitch=6.35mm, Termination=Solder

## Via types
v1: diameter 1.27, hole 0.711, Top Layer to Bottom Layer, tented both sides, 130 vias
v2: diameter 0.6, hole 0.45, Top Layer to Bottom Layer, tented both sides, 13 vias
v3: diameter 0.65, hole 0.4, Top Layer to Bottom Layer, tented both sides, 2 vias

## Nets (pads, with @x,y where several pads share a name; then routed paths per layer and width w, separated by ;. In a path a pad name is that pad's centre, name@x,y a point inside that pad or via, vN(x,y) a via of type N, cw(c..) or ccw(c..) an arc to the next point about the centre after c; other vN are vias at no path point)
+12: 12V.1 C7.2 C8.2 C9.2 C10.2 C11.2 C12.2 C22.2 C23.2 C24.2 D8.2 D9.1 R22.2 R23.2 R24.2 U2.1 U3.1 U4.3 | length 151.4
  Top Layer w0.203: U2.1@106.33,110.72 106.33,111.17